# Altium PCB VCB2020.PcbDoc (part 2 of 3)
Units mm, origin at the board's own origin, x right, y up, seen from the top; angles counter-clockwise.
Board outline 146 x 96 mm, 2 copper layers (Top Layer, Bottom Layer); 155 components, 105 nets, 540 pads, 1006 vias.
Unrouted connection lines stored in the file: 5.
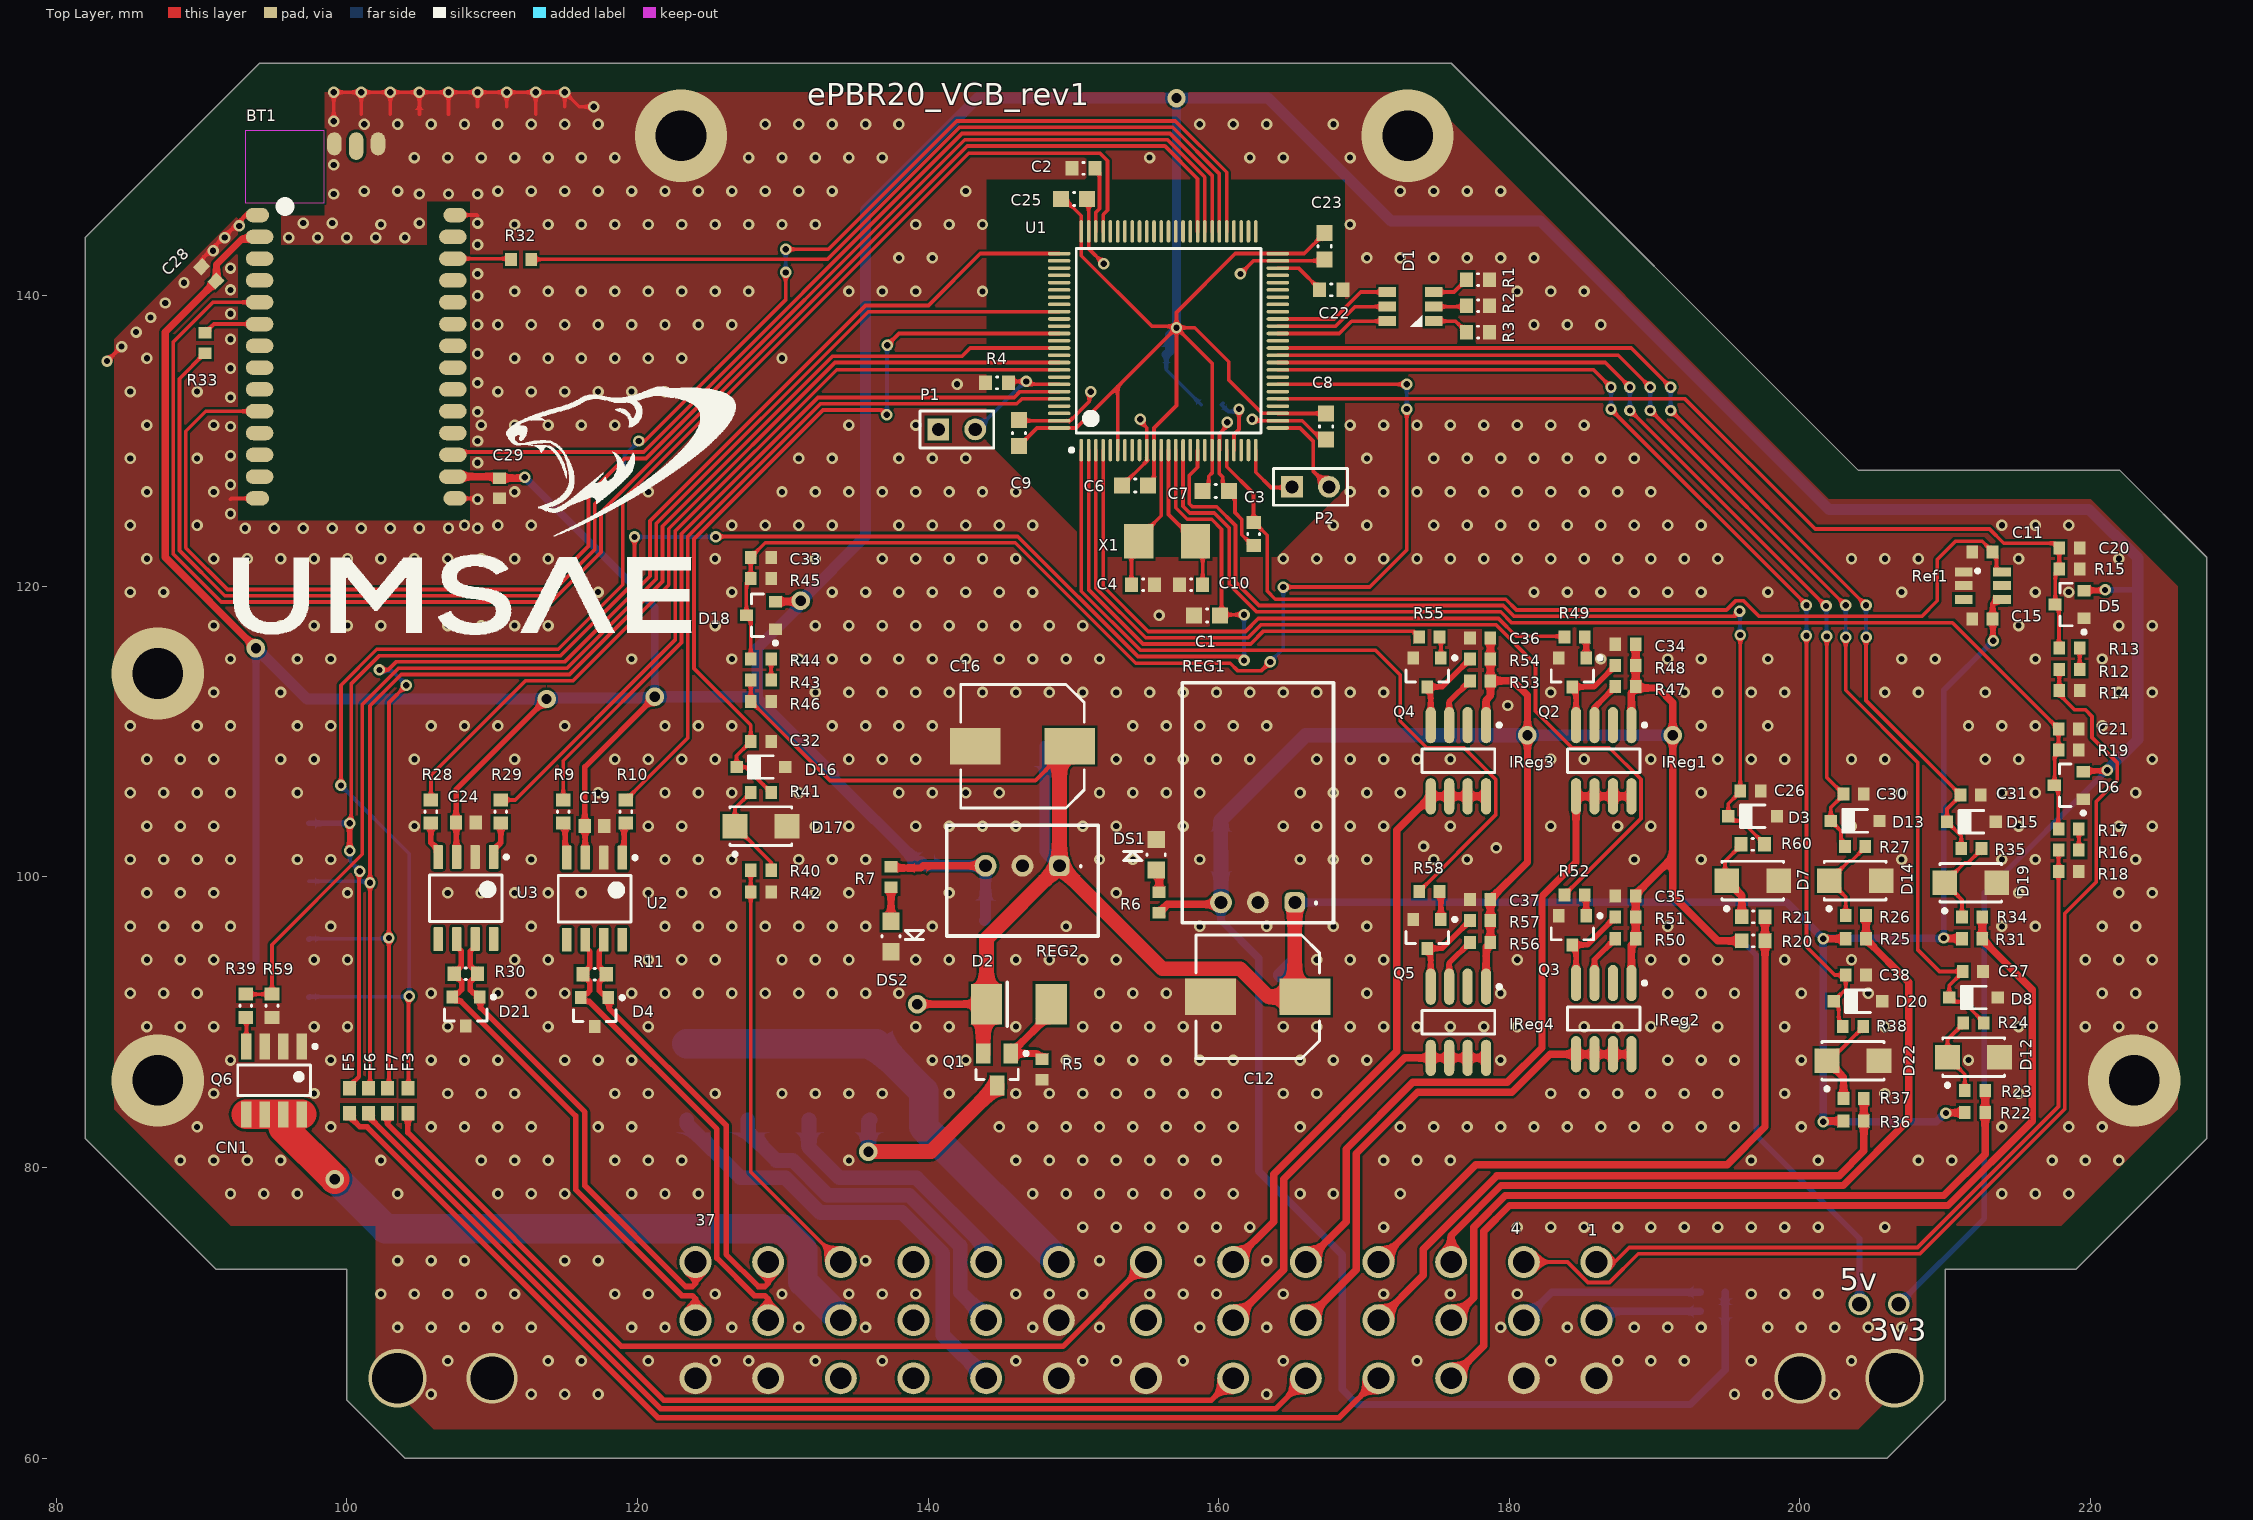
[diagram p0: Top Layer view]

## Part data (continued)
R13 R17: "Resistor", Manufacturer=Yageo, Manufacturer Part Number=RT0603BRD071K3L, Operating Temperature="-55°C ~ 155°C", Package / Case="0603 (1608 Metric)", Power (Watts)="0.1W, 1/10W", Resistance (Ohms)=1.3k, Supplier Device Package=0603, Supplier Part Number 1=YAG1565CT-ND, Temperature Coefficient=±25ppm/°C, Tolerance=±0.1%, Category=Resistors, ComponentLink1Description=http://www.yageo.com/documents/recent/PYu-RT_1-to-0.05_RoHS_L_6.pdf, ComponentLink1URL=http://www.yageo.com/documents/recent/PYu-RT_1-to-0.05_RoHS_L_6.pdf, Composition="Thin Film", Failure Rate=-, Features="Moisture Resistant", Height - Seated (Max)="0.022\" (0.55mm)", Number of Terminations=2, Packaging="Cut Tape (CT)", Part Status=Active, Pricing 1="1=0.55, 10=0.464, 25=0.3376, 50=0.2446, 100=0.1814, 250=0.1392, 500=0.10966, 1000=0.07592 (CAD)", RoHS="RoHS Compliant", Size / Dimension="0.063\" L x 0.031\" W (1.60mm x 0.80mm)", Stock 1=2236, Supplier 1=Digi-Key
R14 R18 R22 R25 R31 R36 R46: "Resistor", Manufacturer=Yageo, Manufacturer Part Number=RC0603JR-0710KL, Operating Temperature="-55°C ~ 155°C", Package / Case="0603 (1608 Metric)", Power (Watts)="0.1W, 1/10W", Resistance (Ohms)=10k, Supplier Device Package=0603, Supplier Part Number 1=311-10KGRCT-ND, Temperature Coefficient=±100ppm/°C, Tolerance=±5%, Category=Resistors, ComponentLink1Description=http://www.yageo.com/NewPortal/yageodocoutput?fileName=/pdf/R-Chip/PYu-RC_Group_51_RoHS_L_4.pdf, ComponentLink1URL=http://www.yageo.com/NewPortal/yageodocoutput?fileName=/pdf/R-Chip/PYu-RC_Group_51_RoHS_L_4.pdf, Composition="Thick Film", Failure Rate=-, Features="Moisture Resistant", Height - Seated (Max)="0.022\" (0.55mm)", Number of Terminations=2, Packaging="Cut Tape (CT)", Part Status=Active, Pricing 1="1=0.16, 10=0.016, 25=0.0112, 50=0.0084, 100=0.0062, 250=0.0048, 500=0.00382, 1000=0.00281 (CAD)", RoHS="RoHS Compliant", Size / Dimension="0.063\" L x 0.031\" W (1.60mm x 0.80mm)", Stock 1=2936292, Supplier 1=Digi-Key
R15 R19 R45: "Resistor", Manufacturer=Yageo, Manufacturer Part Number=RT0603BRD0710KL, Operating Temperature="-55°C ~ 155°C", Package / Case="0603 (1608 Metric)", Power (Watts)="0.1W, 1/10W", Resistance (Ohms)=10k, Supplier Device Package=0603, Supplier Part Number 1=YAG1236CT-ND, Temperature Coefficient=±25ppm/°C, Tolerance=±0.1%, Category=Resistors, ComponentLink1Description=http://www.yageo.com/documents/recent/PYu-RT_1-to-0.05_RoHS_L_6.pdf, ComponentLink1URL=http://www.yageo.com/documents/recent/PYu-RT_1-to-0.05_RoHS_L_6.pdf, Composition="Thin Film", Failure Rate=-, Features="Moisture Resistant", Height - Seated (Max)="0.022\" (0.55mm)", Number of Terminations=2, Packaging="Cut Tape (CT)", Part Status=Active, Pricing 1="1=0.5, 10=0.42, 25=0.3048, 50=0.2212, 100=0.164, 250=0.12592, 500=0.0992, 1000=0.06867 (CAD)", RoHS="RoHS Compliant", Size / Dimension="0.063\" L x 0.031\" W (1.60mm x 0.80mm)", Stock 1=2958, Supplier 1=Digi-Key
R20: library part CMP-1012-00122-1, "100K 0.1W 5% 0603 (1608 Metric)  SMD", Case-EIA=0603, Case-Metric=1608, Power="0.1 W", Tolerance="5 %", Technology=SMT
R21 R60: library part CMP-1012-00115-1, "51K 0.1W 5% 0603 (1608 Metric)  SMD", Case-EIA=0603, Case-Metric=1608, Power="0.1 W", Tolerance="5 %", Technology=SMT
R23 R24 R26 R27 R34 R35 R37 R38: "Resistor", Manufacturer=Yageo, Manufacturer Part Number=RC0603JR-075K1L, Operating Temperature="-55°C ~ 155°C", Package / Case="0603 (1608 Metric)", Power (Watts)="0.1W, 1/10W", Resistance (Ohms)=5.1k, Supplier Device Package=0603, Supplier Part Number 1=311-5.1KGRCT-ND, Temperature Coefficient=±100ppm/°C, Tolerance=±5%, Category=Resistors, ComponentLink1Description=http://www.yageo.com/NewPortal/yageodocoutput?fileName=/pdf/R-Chip/PYu-RC_Group_51_RoHS_L_4.pdf, ComponentLink1URL=http://www.yageo.com/NewPortal/yageodocoutput?fileName=/pdf/R-Chip/PYu-RC_Group_51_RoHS_L_4.pdf, Composition="Thick Film", Failure Rate=-, Features="Moisture Resistant", Height - Seated (Max)="0.022\" (0.55mm)", Number of Terminations=2, Packaging="Cut Tape (CT)", Part Status=Active, Pricing 1="1=0.16, 10=0.016, 25=0.0112, 50=0.0084, 100=0.0062, 250=0.0048, 500=0.00382, 1000=0.00281 (CAD)", RoHS="RoHS Compliant", Size / Dimension="0.063\" L x 0.031\" W (1.60mm x 0.80mm)", Stock 1=782184, Supplier 1=Digi-Key
R32 R33: "Resistor", Manufacturer=Yageo, Manufacturer Part Number=RC0603JR-0722RL, Operating Temperature="-55°C ~ 155°C", Package / Case="0603 (1608 Metric)", Power (Watts)="0.1W, 1/10W", Resistance (Ohms)=22, Supplier Device Package=0603, Supplier Part Number 1=311-22GRCT-ND, Temperature Coefficient=±100ppm/°C, Tolerance=±5%, Category=Resistors, ComponentLink1Description=http://www.yageo.com/NewPortal/yageodocoutput?fileName=/pdf/R-Chip/PYu-RC_Group_51_RoHS_L_4.pdf, ComponentLink1URL=http://www.yageo.com/NewPortal/yageodocoutput?fileName=/pdf/R-Chip/PYu-RC_Group_51_RoHS_L_4.pdf, Composition="Thick Film", Failure Rate=-, Features="Moisture Resistant", Height - Seated (Max)="0.022\" (0.55mm)", Number of Terminations=2, Packaging="Cut Tape (CT)", Part Status=Active, Pricing 1="1=0.16, 10=0.016, 25=0.0112, 50=0.0084, 100=0.0062, 250=0.0048, 500=0.00382, 1000=0.00281 (CAD)", RoHS="RoHS Compliant", Size / Dimension="0.063\" L x 0.031\" W (1.60mm x 0.80mm)", Stock 1=603781, Supplier 1=Digi-Key
R39: library part CMP-1012-00397-1, "100R 0.1W 1% 0603 (1608 Metric)  SMD", Case-EIA=0603, Case-Metric=1608, Power="0.1 W", Tolerance="1 %", Technology=SMT
R43: "Resistor", Manufacturer=Yageo, Manufacturer Part Number=RT0603BRD0739KL, Operating Temperature="-55°C ~ 155°C", Package / Case="0603 (1608 Metric)", Power (Watts)="0.1W, 1/10W", Resistance (Ohms)=39k, Supplier Device Package=0603, Supplier Part Number 1=YAG1649CT-ND, Temperature Coefficient=±25ppm/°C, Tolerance=±0.1%, Category=Resistors, ComponentLink1Description=http://www.yageo.com/documents/recent/PYu-RT_1-to-0.05_RoHS_L_6.pdf, ComponentLink1URL=http://www.yageo.com/documents/recent/PYu-RT_1-to-0.05_RoHS_L_6.pdf, Composition="Thin Film", Failure Rate=-, Features="Moisture Resistant", Height - Seated (Max)="0.022\" (0.55mm)", Number of Terminations=2, Packaging="Cut Tape (CT)", Part Status=Active, Pricing 1="1=0.55, 10=0.464, 25=0.3376, 50=0.2446, 100=0.1814, 250=0.1392, 500=0.10966, 1000=0.07592 (CAD)", RoHS="RoHS Compliant", Size / Dimension="0.063\" L x 0.031\" W (1.60mm x 0.80mm)", Stock 1=2740, Supplier 1=Digi-Key
R44: "Resistor", Manufacturer=Yageo, Manufacturer Part Number=AT0603BRD072KL, Operating Temperature="-55°C ~ 155°C", Package / Case="0603 (1608 Metric)", Power (Watts)="0.1W, 1/10W", Resistance (Ohms)=2k, Supplier Device Package=0603, Supplier Part Number 1=YAG2112CT-ND, Temperature Coefficient=±25ppm/°C, Tolerance=±0.1%, Category=Resistors, ComponentLink1Description=http://www.yageo.com/documents/recent/PYu-AT_51_RoHS_L-3.pdf, ComponentLink1URL=http://www.yageo.com/documents/recent/PYu-AT_51_RoHS_L-3.pdf, Composition="Thin Film", Failure Rate=-, Features="Anti-Sulfur, Automotive AEC-Q200, Moisture Resistant", Height - Seated (Max)="0.022\" (0.55mm)", Number of Terminations=2, Packaging="Cut Tape (CT)", Part Status=Active, Pricing 1="1=0.59, 10=0.431, 25=0.3188, 50=0.235, 100=0.1725, 250=0.14248, 500=0.11746, 1000=0.08498 (CAD)", RoHS="RoHS Compliant", Size / Dimension="0.063\" L x 0.032\" W (1.60mm x 0.80mm)", Stock 1=1218, Supplier 1=Digi-Key
R47 R50 R53 R56: "Resistor", Manufacturer=Yageo, Manufacturer Part Number=RC0603FR-072RL, Operating Temperature="-55°C ~ 155°C", Package / Case="0603 (1608 Metric)", Power (Watts)="0.1W, 1/10W", Resistance (Ohms)=2, Supplier Device Package=0603, Supplier Part Number 1=311-2.00HRCT-ND, Temperature Coefficient=±200ppm/°C, Tolerance=±1%, Category=Resistors, ComponentLink1Description=http://www.yageo.com/NewPortal/yageodocoutput?fileName=/pdf/R-Chip/PYu-RC_Group_51_RoHS_L_4.pdf, ComponentLink1URL=http://www.yageo.com/NewPortal/yageodocoutput?fileName=/pdf/R-Chip/PYu-RC_Group_51_RoHS_L_4.pdf, Composition="Thick Film", Failure Rate=-, Features="Moisture Resistant", Height - Seated (Max)="0.022\" (0.55mm)", Number of Terminations=2, Packaging="Cut Tape (CT)", Part Status=Active, Pricing 1="1=0.16, 10=0.03, 25=0.022, 50=0.0166, 100=0.0122, 250=0.00936, 500=0.00746, 1000=0.0055 (CAD)", RoHS="RoHS Compliant", Size / Dimension="0.063\" L x 0.031\" W (1.60mm x 0.80mm)", Stock 1=84378, Supplier 1=Digi-Key
R48 R51 R54 R57: "Resistor", Manufacturer=Yageo, Manufacturer Part Number=RC0603JR-07110KL, Operating Temperature="-55°C ~ 155°C", Package / Case="0603 (1608 Metric)", Power (Watts)="0.1W, 1/10W", Resistance (Ohms)=110k, Supplier Device Package=0603, Supplier Part Number 1=311-110KGRCT-ND, Temperature Coefficient=±100ppm/°C, Tolerance=±5%, Category=Resistors, ComponentLink1Description=http://www.yageo.com/NewPortal/yageodocoutput?fileName=/pdf/R-Chip/PYu-RC_Group_51_RoHS_L_4.pdf, ComponentLink1URL=http://www.yageo.com/NewPortal/yageodocoutput?fileName=/pdf/R-Chip/PYu-RC_Group_51_RoHS_L_4.pdf, Composition="Thick Film", Failure Rate=-, Features="Moisture Resistant", Height - Seated (Max)="0.022\" (0.55mm)", Number of Terminations=2, Packaging="Cut Tape (CT)", Part Status=Active, Pricing 1="1=0.16, 10=0.016, 25=0.0112, 50=0.0084, 100=0.0062, 250=0.0048, 500=0.00382, 1000=0.00281 (CAD)", RoHS="RoHS Compliant", Size / Dimension="0.063\" L x 0.031\" W (1.60mm x 0.80mm)", Stock 1=85509, Supplier 1=Digi-Key
R59: library part CMP-1012-00623-1, "10K 0.1W 1% 0603 (1608 Metric)  SMD", Case-EIA=0603, Case-Metric=1608, Power="0.1 W", Tolerance="1 %", Technology=SMT
Ref1: Current - Cathode=-, Current - Output=10mA, Current - Supply=600µA, Digikey Part Number=LT6654AHS6-3.3#TRMPBFCT-ND, Manufacturer="Linear Technology", Operating Temperature="-40°C ~ 125°C (TA)", Package / Case="SOT-23-6 Thin, TSOT-23-6", Supplier Device Package=TSOT-23-6, Temperature Coefficient=10ppm/°C, Tolerance=±0.05%, Voltage - Input="3.8 V ~ 36 V", Voltage - Output (Min/Fixed)=3.3V, Category="Integrated Circuits (ICs)", ComponentLink1Description=http://www.linear.com/docs/29677, ComponentLink1URL=http://www.linear.com/docs/29677, Digikey Link=http://www.digikey.com/product-detail/en/linear-technology/LT6654AHS6-3.3-TRMPBF/LT6654AHS6-3.3-TRMPBFCT-ND/2485839, Manufacturer Part Number=LT6654AHS6-3.3, Mounting Type="Surface Mount", Noise - 0.1Hz to 10Hz=1.7ppmp-p, Noise - 10Hz to 10kHz=2ppmrms, Output Type=Fixed, Packaging="Cut Tape (CT)", Part Status=Active, Pricing 1="1=9.53, 25=8.508, 100=5.5596, 250=5.1048 (CAD)", Reference Type=Series, RoHS="RoHS Compliant", Stock 1=1315, Supplier 1=Digi-Key, Supplier Part Number 1=LT6654AHS6-3.3#TRMPBFCT-ND, Voltage - Output (Max)=-
REG1: Current - Output (Max)=1.5A, Manufacturer="Murata Power Solutions Inc.", Manufacturer Part Number=OKI-78SR-3.3/1.5-W36-C, Operating Temperature="-40°C ~ 85°C", Package / Case="3-SIP Module", Power (Watts) - Manufacture Series=5W, Supplier Part Number 1=811-2195-5-ND, Voltage - Input (Max)=36V, Voltage - Input (Min)=7V, Voltage - Isolation=-, Voltage - Output 1=3.3V, Applications="ITE (Commercial)", Category="Power Supplies - Board Mount", ComponentLink1Description=http://www.murata-ps.com/data/power/oki-78sr.pdf, ComponentLink1URL=http://www.murata-ps.com/data/power/oki-78sr.pdf, ComponentLink2Description=http://power.murata.com/data/power/oki-78sr.pdf, ComponentLink2URL=http://power.murata.com/data/power/oki-78sr.pdf, Efficiency=85.5%, Features=SCP, Mounting Type="Through Hole", Number of Outputs=1, Packaging=Tube, Part Status=Active, Power (Watts) - Max=5W, Pricing 1="1=6.23, 5=6.174, 10=6.132, 25=6.0444, 50=5.856, 100=5.4792, 250=5.22456 (CAD)", Pricing 2="1=6.31, 5=6.248, 10=6.205, 25=6.1168, 50=5.9262, 100=5.5449, 250=5.28716 (CAD)", RoHS="RoHS Compliant", Size / Dimension="0.41\" L x 0.30\" W x 0.65\" H (10.4mm x 7.6mm x 16.5mm)", Stock 1=3616, Stock 2=10314, Supplier 1=Digi-Key, Supplier 2=Digi-Key, Supplier Part Number 2=811-2692-ND, Type="Linear Regulator Replacement", Voltage - Output 2=-, Voltage - Output 3=-
REG2: library part OKI-78SR-5, "3.3V DCDC", Current - Output (Max)=1.5A, Manufacturer="Murata Power Solutions Inc.", Manufacturer Part Number=OKI-78SR-3.3/1.5-W36H-C, Operating Temperature="-40°C ~ 85°C", Package / Case="3-SIP Module", Power (Watts) - Manufacture Series=5W, Supplier Part Number 1=811-2196-5-ND, Voltage - Input (Max)=36V, Voltage - Input (Min)=7V, Voltage - Isolation=-, Voltage - Output 1=3.3V, Applications="ITE (Commercial)", Category="Power Supplies - Board Mount", ComponentLink1Description=http://power.murata.com/data/power/oki-78sr.pdf, ComponentLink1URL=http://power.murata.com/data/power/oki-78sr.pdf, Efficiency=85.5%, Features=SCP, Mounting Type="Through Hole", Number of Outputs=1, Packaging=Tray, Part Status=Active, Pricing 2="1=6.31, 5=6.248, 10=6.205, 25=6.1168, 50=5.9262, 100=5.5449, 250=5.28716 (CAD)", RoHS="RoHS Compliant", Size / Dimension="0.65\" L x 0.41\" W x 0.30\" H (16.5mm x 10.4mm x 7.6mm)", Stock 2=4108, Supplier 1=Digi-Key, Supplier 2=Digi-Key, Supplier Part Number 2=811-3014-ND, Type="Linear Regulator Replacement", Voltage - Output 2=-, Voltage - Output 3=-
U1: library part CMP-0243-00221-1, "ARM Cortex-M4 32-bit MCU+FPU, 512 KB Flash, 128 KB Internal RAM, 81 I/Os, 100-Pin LQFP, -40 to 105 degC, Tray", I/Os (High Current)=81, Operating Frequency(F) (Processor speed) (MHz)=180, Package Description=LQFP100, Package Reference="100-Pin Low Profile Quad Flat Package, Body 14 x 14 mm, Pitch 0.5 mm", Supply Voltage(Vcc) min (V)=1.7, ComponentLink1Description="Manufacturer URL", ComponentLink1URL=http://www.st.com/, ComponentLink2Description=Datasheet, ComponentLink2URL=http://www.st.com/st-web-ui/static/active/en/resource/technical/document/datasheet/DM00141306.pdf, Core="ARM Cortex-M4", D/A Converter=2, DatasheetVersion="Rev. 6", FLASH Size (Prog) (kB)=512, Internal RAM Size (kB)=128, Mounting Technology="Surface Mount", Packing=Tray, PartId=1
U2 U3: library part CMP-0315-00075-2, "3.3 V Can Transceiver, 17 mA, -40 to 85 degC, 8-pin SOIC (D), Green (RoHS & no Sb/Br)", Drivers Per Package=1, Manufacturer="Texas Instruments", Rating=Catalog, Supply Voltage(s)(V)=3.3, Code_JEDEC=MS-012AA, ComponentLink1Description=Datasheet, ComponentLink1URL=http://www.ti.com/general/docs/lit/getliterature.tsp?genericPartNumber=SN65HVD232&fileType=pdf, DatasheetVersion=SLOS346K, Eco-Plan="Green (RoHS & no Sb/Br)", ICC(Max)(mA)=17, Isolated=No, Mounting Technology="Surface Mount", PackageDescription="8-Pin Plastic Small Outline Integrated Circuit, 4.9 x 3.9 mm, Pitch 1.27 mm Pitch", PackageReference=D0008A, PackageVersion="revM, Jun-2011", PartNumber=SN65HVD232DR, Receivers Per Package=1, SubFamily=CAN, Transient Pulse Protection(V)="-25 to 25"
X1: library part "8MHz crystal, 7A-8.000MAAJ-T", ESR (Equivalent Series Resistance)="80 Ohm", Frequency=8MHz, Frequency Stability=±30ppm, Load Capacitance=18pF, Manufacturer="TXC CORPORATION", Operating Mode=Fundamental, Operating Temperature="-20°C ~ 70°C", Package / Case="2-SMD, No Lead", Ratings=-, Supplier Part Number 1=887-1448-1-ND, Category="Crystals, Oscillators, Resonators", ComponentLink1Description=http://www.txccrystal.com/images/pdf/7a.pdf, ComponentLink1URL=http://www.txccrystal.com/images/pdf/7a.pdf, Frequency Tolerance=±30ppm, Height - Seated (Max)="0.053\" (1.35mm)", Manufacturer Part Number=7A-8.000MAAJ-T, Mounting Type="Surface Mount", Packaging="Cut Tape (CT)", Part Status=Active, Pricing 1="1=1.12, 10=0.989, 50=0.9234, 100=0.8162, 500=0.77322 (CAD)", RoHS="RoHS Compliant", Size / Dimension="0.197\" L x 0.126\" W (5.00mm x 3.20mm)", Stock 1=30692, Supplier 1=Digi-Key, Type="MHz Crystal"

## Via types
v1: diameter 0.787, hole 0.423, Top Layer to Bottom Layer, 859 vias
v2: diameter 0.787, hole 0.432, Top Layer to Bottom Layer, 126 vias
v3: diameter 1.27, hole 0.711, Top Layer to Bottom Layer, 10 vias
v4: diameter 6.35, hole 3.48, Top Layer to Bottom Layer, 5 vias
v5: diameter 1.5, hole 1, Top Layer to Bottom Layer, 2 vias
v6: diameter 3.5, hole 3, Top Layer to Bottom Layer, 2 vias
v7: diameter 4, hole 3.5, Top Layer to Bottom Layer, 2 vias

## Nets (pads, with @x,y where several pads share a name; then routed paths per layer and width w, separated by ;. In a path a pad name is that pad's centre, name@x,y a point inside that pad or via, vN(x,y) a via of type N, cw(c..) or ccw(c..) an arc to the next point about the centre after c; other vN are vias at no path point)
3v3: BT1.2 BT1.16 C5.2 C6.2 C7.2 C8.2 C9.2 C18.2 C19.2 C23.2 C24.2 C25.2 C28.2 C29.2 D5.2 D6.2 D9.2 D10.2 D11.2 D18.2 D23.2 L1.1 R7.1 R8.2 REG2.3 U1.6 U1.11 U1.19 U1.28 U1.50 U1.75 U1.100 U2.3 U3.3 | length 484.8
  Top Layer w0.254: C9.2@146.25,129.65 147.5,130.9 U1.100@149.025,130.9 150.2,130.9 153.05,133.75 ; C25.2@148.85,146.654 149.004,146.5 149.55,146.5 150.552,145.498 150.552,144.427 U1.75@150.55,144.425 150.552,144.423 150.552,142.748 155.408,137.892 157.008,137.892 157.008,137.708 153.05,133.75 ; U1.6@153.05,129.375 153.05,133.75 ; C6.2@155.15,126.95 155.55,127.35 U1.11@155.55,129.375 155.55,130.9 157.1,132.45 v2(157.1,137.8) ; C7.2@158.9,126.55 159.323,126.973 159.323,127.573 159.55,127.8 U1.19@159.55,129.375 159.55,135.35 v2(157.1,137.8) ; C23.2@167.3,144.304 165.896,142.9 U1.50@164.075,142.9 161.15,142.9 157.1,138.85 v2(157.1,137.8) ; C8.2@167.4,131.55 167.05,131.9 U1.28@164.075,131.9 164.073,131.902 162.998,131.902 160.699,134.201 160.699,135.451 158.35,137.8 v2(157.1,137.8)
  Top Layer w0.381: U3.3@107.561,101.371 107.541,101.391 107.541,103.73 C24.2@107.521,103.75 107.521,106.021 v3(113.748,112.247) ; U2.3@116.419,101.329 116.399,101.349 116.399,103.489 C19.2@116.379,103.509 116.379,107.579 v3(121.2,112.4) ; D6.2@219.5,107.25 219.55,107.3 221.1,107.3 v2(221.15,107.35) ; D5.2@219.55,119.7 219.575,119.725 220.975,119.725 v2(221,119.75)
  Top Layer w0.508: C28.2@90.995,141.005 91.038,141.048 91.038,142.145 92.792,143.9 93.85,143.9 BT1.2@94,144.05 ; C28.2@91,141 87.5,137.5 87.5,122 v3(93.75,115.75) ; BT1.16@107.3,127.55 110.4,127.55 C29.2@110.5,127.45 112.2,127.45 v2(112.25,127.5) ; D18.2@129.5,118.95 131.2,118.95 v3(131.25,119) ; R7.1@137.45,100.7 137.535,100.615 139.5,100.615 139.655,100.77 REG2.3@143.96,100.77
  Bottom Layer w0.254: C5.2@156.4,135.95 156.4,134.9 L1.1@158.8,132.5
  Bottom Layer w0.381: v5(206.8,70.6) 212.7,76.5 212.7,98.9 v2(221.15,107.35) ; v2(221,119.75) 223.15,119.75 223.25,119.85
  Bottom Layer w0.508: 93.75,94.221 v3(93.75,115.75) ; v2(112.25,127.5) 121.2,118.55 v3(121.2,112.4)
  Bottom Layer w0.635: C5.2@156.4,135.95 156.633,136.183 156.633,137.291 157.1,137.759 v2(157.1,137.8) v3(157.1,153.6)
  Bottom Layer w0.762: v3(93.75,115.75) 97.253,112.247 v3(113.748,112.247) 113.824,112.324 121.124,112.324 v3(121.2,112.4) 128.15,112.4 ; C18.2@143.9,97 143.96,97.06 REG2.3@143.96,100.77 139.78,100.77 R8.2@139.5,101.05 139.225,101.05 133.541,106.735 133.541,107.01 128.15,112.4 ; v2(221.15,107.35) 223.25,109.45 223.25,119.85 223.25,121.95 219.9,125.3 202,125.3 182.15,145.15 171.85,145.15 163.4,153.6 v3(157.1,153.6) 143.4,153.6 135.7,145.9 135.7,123.45 v3(131.25,119) 131.25,118.75 128.25,115.75 128.25,112.5 128.15,112.4
3v3ref: C3.2 C11.2 Ref1.6 U1.21 | length 67.9
  Top Layer w0.254: U1.21@160.55,129.375 160.552,129.373 160.552,128.229 162.4,126.381 C3.2@162.4,124.4 162.45,124.4 163.337,123.513 163.337,119.677 163.9,119.114 179.764,119.114 180.5,118.378 194.94,118.378 195.561,118.998 196.139,118.998 197.206,117.932 208.382,117.932 209.45,119 209.45,121.85 210.709,123.109 212.545,123.109 213.25,122.404 C11.2@213.25,122.354 213.523,122.081 213.523,121.183 213.706,121 Ref1.6@213.9,121